# Altium PCB Audio_Meter_V4.5.PcbDoc (part 1 of 5)
Units mil, origin at the board's own origin, x right, y up, seen from the top; angles counter-clockwise.
Board outline 2756.14 x 2519.69 mil, 2 copper layers (Top Layer, Bottom Layer), stack 57.087 mil thick; 109 components, 62 nets, 315 pads, 566 vias.
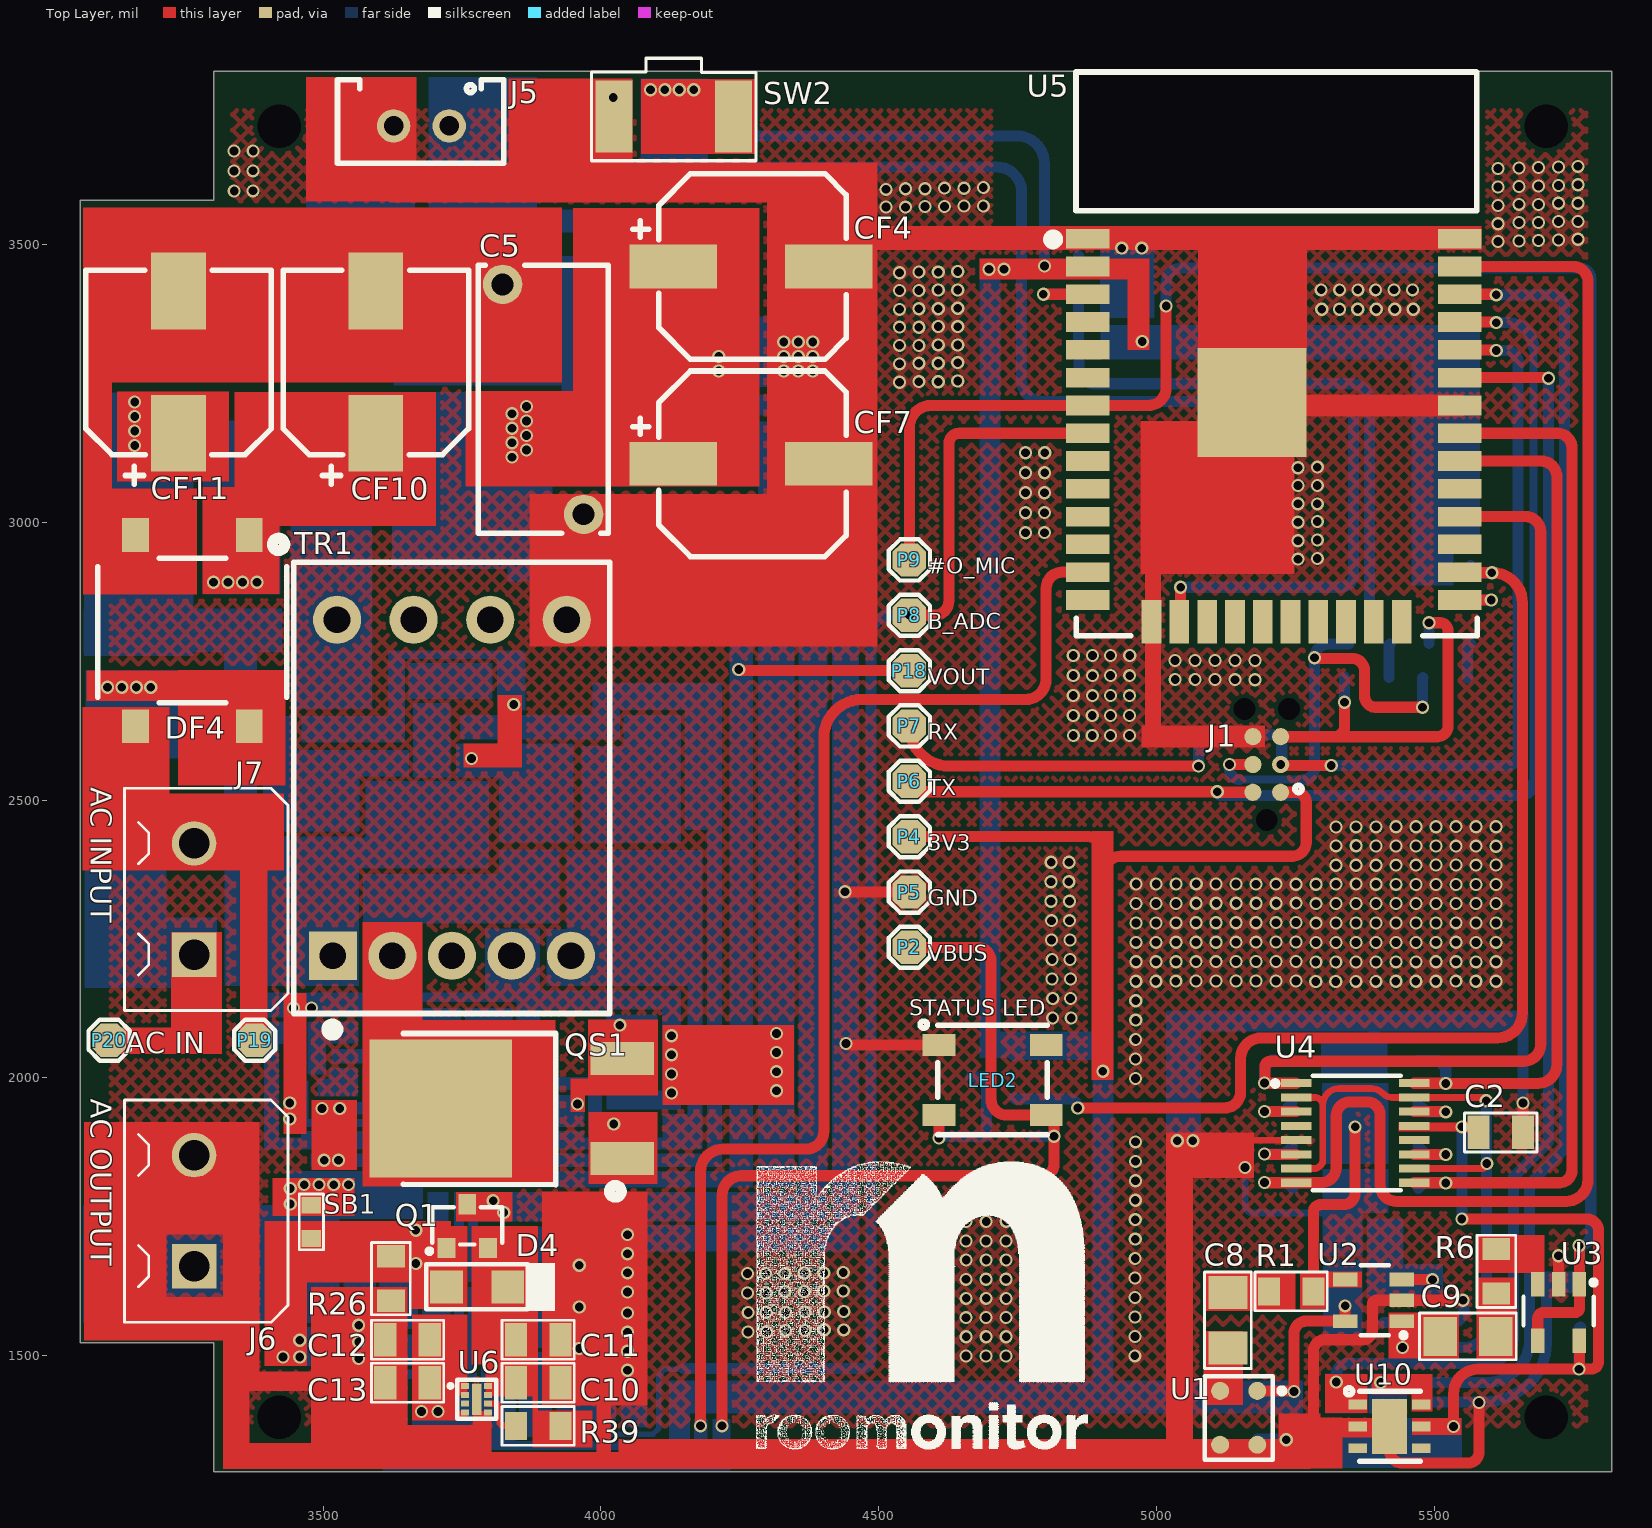
[diagram p0: Top Layer view]
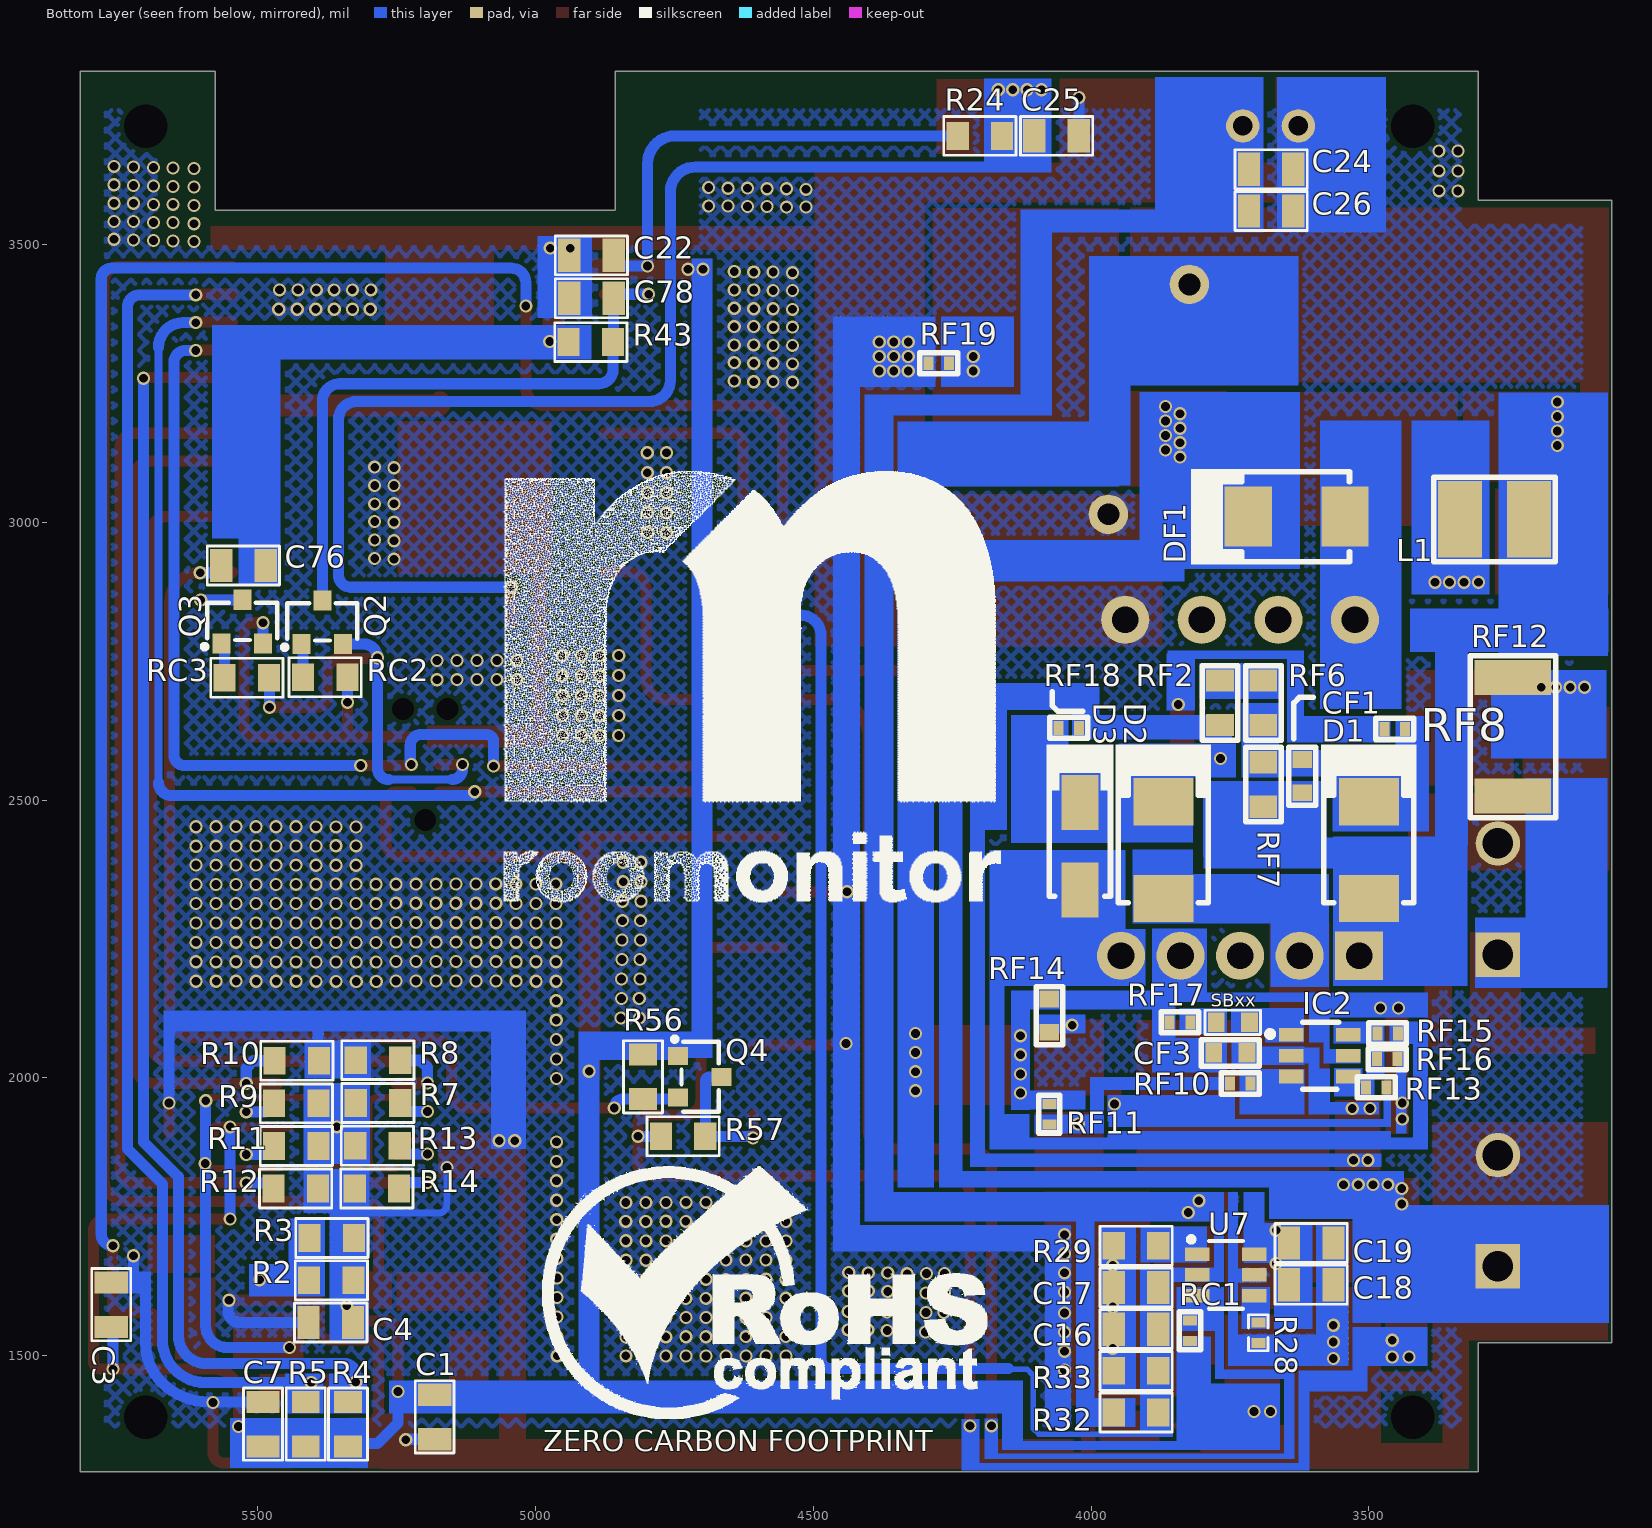
[diagram p1: Bottom Layer view, seen from below]
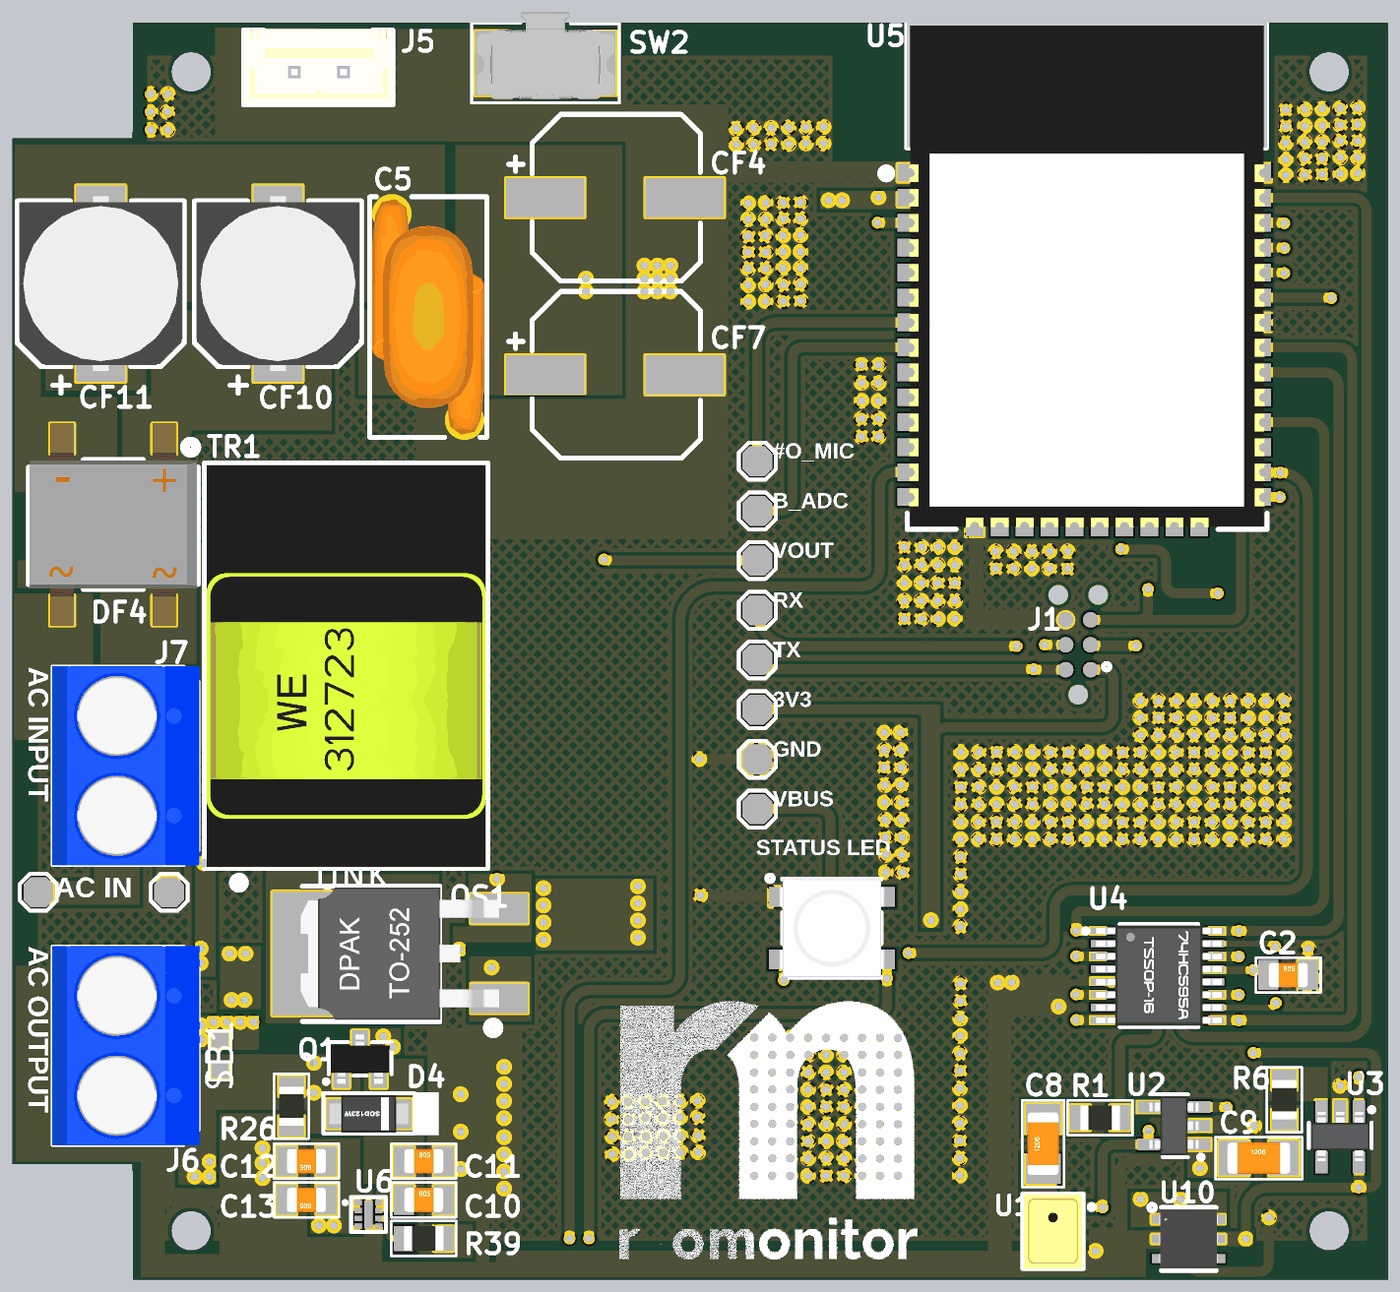
[diagram p3: 3D render of the assembled board from above, using the file's embedded part models]
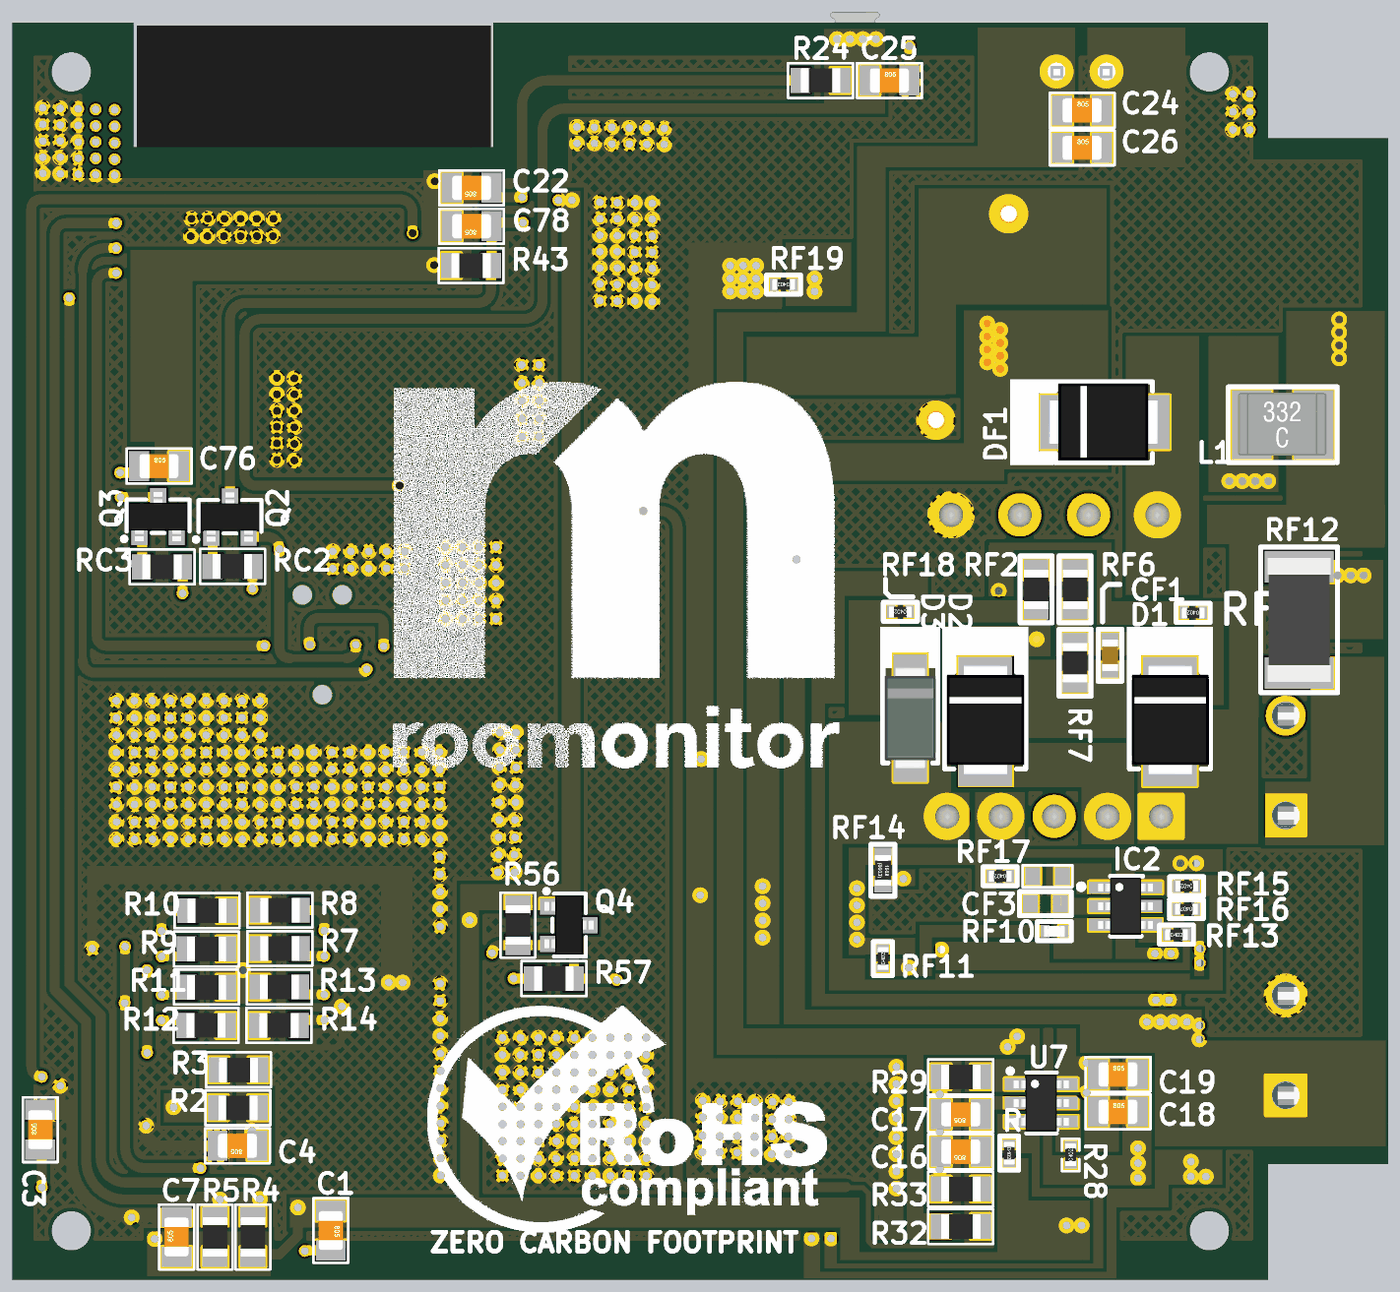
[diagram p4: 3D render of the assembled board from below, using the file's embedded part models]

## Layer stack, top to bottom
Top Solder: solder mask 2.7559, Solder Resist, Dk 3.5
Top Layer: signal copper 13.7795
Dielectric 1: dielectric 29.5276, FR-4, Dk 4.8
Bottom Layer: signal copper 13.7795
Bottom Solder: solder mask 3.1496, Solder Resist, Dk 3.5

## Board outline
3062.84,1523.28 3062.84,3579.03 3303,3579.03 3303,3811 4856,3811 4856,3561 5576,3561 5576,3811 5818.98,3811 5818.98,1291.32 3303,1291.31 3303,1523.28

## Design rules (kind name [scope] priority, off if disabled: settings)
Clearance [All] p1: gap=7 ignorepadtopadclearanceinfootprint=FALSE except(3: Arc-SMDPad Track-SMDPad SMDPad-SMDPad)
ComponentClearance [All] p1: gap=0 collisioncheckmode=3 verticalgap=0 showdistances=FALSE
MinimumSolderMaskSliver [All] p1: minsoldermaskwidth=0
PolygonConnect [All] p1: connectstyle=Direct reliefconductorwidth=10 reliefentries=4 polygonreliefangle="90 Angle" airgapwidth=10
RoutingVias [All] p1: holewidth=15.75 width=23.62 viastyle="Through Hole" minholewidth=15.75 minwidth=23.62 maxholewidth=28 maxwidth=50
SilkToSilkClearance [All] p1: silktosilkclearance=0
SilkToSolderMaskClearance [IsPad] p1: minsilkscreentomaskgap=0 clearancetoexposedcopper=TRUE
SolderMaskExpansion [All] p1: expansion=4
Width [All] p1: maxlimit=40 minlimit=10 preferedwidth=12
26 further rules are at their usual default settings.

## Classes and differential pairs
component class U_Supply_Section: TR1
component class U_Sensor_Section: C7 R4 R5 U10
component class U_Power_Section: C10 C11 C12 C13 D4 LED2 Q1 R26 R39 U6
component class U_Controller_Section: C22 C25 C76 C78 Q2 Q3 Q4 R24 R43 R56 R57 RC2 RC3 SW2 U5
component class U_Connector_Section: C24 C26 J1 J5 J6 J7 P2 P4 P5 P6 P7 P18 P19 P20 SB1
component class "U_Battery Charging_Section": C16 C17 C18 C19 P8 R28 R29 R32 R33 RC1 U7
component class U_Audio_Section: C1 C2 C3 C4 C8 C9 P9 R1 R2 R3 R6 R7 R8 R9 R10 R11 R12 R13 R14 U1 U2 U3 U4

## Components (designator, comment, footprint, x,y, rotation, side; value= is the part's Value field where it differs from the comment)
C1 "0.1uF" Cap0805 5181,1390 r270 bottom
C2 "0.1uF" Cap0805 5619,1902 r0 top
C3 "0.1uF" Cap0805 5763,1592 r90 bottom
C4 "0.1uF" Cap0805 5368,1560 r0 bottom
C5 "1000pF" RAD-0.4 3896,3221 r90 top
C7 "0.1uF" Cap0805 5490,1377 r90 bottom
C8 "1206YC105K4T2A" Cap1206 5128,1564 r90 top
C9 "1206YC105K4T2A" Cap1206 5560,1535 r0 top
C10 "0.1uF" Cap0805 3887,1451.5 r0 top
C11 "1uF" Cap0805 3887,1529 r0 top
C12 "0.1uF" Cap0805 3652,1529 r180 top
C13 "1uF" Cap0805 3652,1451.5 r180 top
C16 "1uF" Cap0805 3919,1548 r0 bottom
C17 "0.1uF" Cap0805 3919,1623 r0 bottom
C18 "1uF" Cap0805 3604,1628 r180 bottom
C19 "0.1uF" Cap0805 3604,1703 r180 bottom
C22 "0.1uF" Cap0805 4899,3480 r0 bottom
C24 "0.1uF" Cap0805 3676,3635 r180 bottom
C25 "0.1uF" Cap0805 4062,3695 r180 bottom
C26 "4.7UF" Cap0805 3676,3560 r180 bottom
C76 "0.1uF" Cap0805 5525,2922 r180 bottom
C78 "1uF" Cap0805 4899,3403 r0 bottom
CF1 "1nF" Cap0603 3620,2543 r270 bottom
CF3 "0.33uF" Cap0603 3749.5,2045 r180 bottom
CF4 "560uF" EEE-TC1A561UV 4270,3460 r0 top
CF7 "560uF" EEE-TC1A561UV 4270,3105 r0 top
CF10 "4.7uF" ULR2G4R7MNL1GS 3595,3287.95 r90 top
CF11 "4.7uF" ULR2G4R7MNL1GS 3240,3287.95 r90 top
D1 "SMBJP6KE82A-TP" SMB 3500,2410 r90 bottom
D2 "MURS160-13" SMB 3870,2410 r90 bottom
D3 "RS1B-13-F" SMA 4020,2417 r90 bottom
D4 "PMEG3010ER,115" PMEG3010ER,115 3722,1624 r0 top
DF1 "B340LB-13-F" SMB 3630,3010 r0 bottom
DF4 "DF04S-T" DF04S-T 3265,2805 r0 top
IC2 "UCC28700DBVR" SOT-23-6 3588.82,2040 r180 bottom
J1 "TC2030-IDC" TC2030-IDC 5198,2564 r90 top
J5 "B2B-EH-A(LF)(SN)" B2B-EH-A(LF)(SN) 3677,3713 r180 top
J6 "Terminal Block 2POS" "Terminal Block 2P" 3268,1661 r90 top
J7 "Terminal Block 2POS" "Terminal Block 2P" 3268,2222 r90 top
L1 "470uH" 84474C 3275,3005 r180 bottom
LED2 "1655" 1655 4704.61,1996.01 r0 top locked
P2 "TEST POINT" "TEST POINT" 4555,2235 r0 top
P4 "TEST POINT" "TEST POINT" 4555,2434.14 r0 top
P5 "TEST POINT" "TEST POINT" 4555,2334.57 r0 top
P6 "TEST POINT" "TEST POINT" 4555,2533.71 r0 top
P7 "TEST POINT" "TEST POINT" 4555,2633.29 r0 top
P8 "TEST POINT" "TEST POINT" 4555,2832.43 r0 top
P9 "TEST POINT" "TEST POINT" 4555,2932 r0 top
P18 "TEST POINT" "TEST POINT" 4555,2732.86 r0 top
P19 "TEST POINT" "TEST POINT" 3377,2068 r0 top
P20 "TEST POINT" "TEST POINT" 3115,2068 r0 top
Q1 "DMP2045U-7" SOT-23 3759.4,1733.37 r0 top
Q2 "MMBT2222A-7-F" SOT-23 5383,2820 r180 bottom
Q3 "MMBT2222A-7-F" SOT-23 5527,2821 r180 bottom
Q4 "BSS138LT1G" SOT-23 4704,2002 r270 bottom
QS1 "STD2HNK60Z" STD2HNK60Z 3875,1945 r90 top
R1 "1K" RES0805 5242,1616 r0 top
R2 "10K" RES0805 5367,1636 r180 bottom
R3 "10K" RES0805 5366,1712 r180 bottom
R4 "10K" RES0805 5337,1377 r270 bottom
R5 "10K" RES0805 5413,1377 r270 bottom
R6 "1K" RES0805 5611,1652 r270 top
R7 "47K" RES0805 5283,1955 r0 bottom
R8 "10K" RES0805 5283,2032 r180 bottom
R9 "100K" RES0805 5430,1954.33 r180 bottom
R10 "10K" RES0805 5429,2031 r0 bottom
R11 "220K" RES0805 5430,1877.67 r180 bottom
R12 "10K" RES0805 5431,1801 r0 bottom
R13 "470K" RES0805 5284,1878 r0 bottom
R14 "10K" RES0805 5285,1801 r180 bottom
R24 "10K" RES0805 4200,3695 r0 bottom
R26 "100K" RES0805 3622,1639 r90 top
R28 "665R" Res0402 3699,1541.5 r90 bottom
R29 "10K" RES0805 3919,1698 r180 bottom
R32 "1M" RES0805 3919,1398 r0 bottom
R33 "1M" RES0805 3919,1473 r0 bottom
R39 "10K" RES0805 3887,1374 r0 top
R43 "10K" RES0805 4900,3324 r0 bottom
R56 "10K" RES0805 4806,2002 r270 bottom
R57 "10K" RES0805 4734,1895 r180 bottom
RC1 "10K" Res0402 3822,1545 r270 bottom
RC2 "10K" RES0805 5378,2721 r0 bottom
RC3 "10K" RES0805 5519,2720 r0 bottom
RF2 "5.11M" "RES 0805" 3768,2675 r90 bottom
RF6 "5.11M" "RES 0805" 3690,2675 r90 bottom
RF7 "5.11M" "RES 0805" 3690,2528 r270 bottom
RF8 "487R" Res0402 3453.5,2628 r0 bottom
RF10 "10R" Res0402 3731.5,1990 r180 bottom
RF11 "10K" Res0402 4075,1935 r90 bottom
RF12 "10R" "RES 2512" 3241,2614 r270 bottom
RF13 "4.64K" Res0402 3487,1983 r180 bottom
RF14 "2.05R" Res0603 4075,2112 r270 bottom
RF15 "121K" Res0402 3466.5,2080 r0 bottom
RF16 "30.1K" Res0402 3467,2034 r0 bottom
RF17 "10K" Res0402 3840,2100 r0 bottom
RF18 "22.6R" Res0402 4040,2630 r0 bottom
RF19 "3.01K" Res0402 4274,3286 r0 bottom
SB1 "Solder Bridge" "Solder Bridge" 3479,1741 r90 top
SBxx "Solder Bridge" "Solder Bridge" 3745,2100 r0 bottom
SW2 "Switch" KSS221GLFS 4131,3730 r180 top
TR1 "750312723" 750312723 3731.83,2522.17 r90 top
U1 "SPU0410HR5H-PB" SPU0410HR5H-PB 5114.07,1437 r0 top locked
U2 "OPA344NA/250" SOT23-5 5390,1600 r180 top locked
U3 "OPA344NA/250" SOT23-5 5723,1578 r270 top locked
U4 "ADG712BRUZ-REEL" 16-TSSOP 5360,1901 r0 top locked
U5 "ESP32-WROOM-32 (16MB)" "ESP32-WROOM-32 (16MB)" 5210.35,3165.31 r0 top locked
U6 "NCP186AMX330TAG" NCP186AMX330TAG 3776.33,1421.87 r0 top
U7 "BQ21040DBVR" SOT-23-6 3757.82,1645.6 r180 bottom
U10 "SI7021-A20-GM1R" SI7021-A20-GM1R 5419.09,1373 r0 top locked

## Footprints (in the part's own frame and the unit in brackets; to place one, negate y for a bottom-side part, rotate by r counter-clockwise, add the part's x,y. Pads: shape width x height; smd on the part's side, far side on the other; paste and mask are expansions set on the pad)
16-TSSOP [mm]
  rect 1.4x0.37 smd: 1(-2.775,2.275) 2(-2.775,1.625) 3(-2.775,0.975) 4(-2.775,0.325) 5(-2.775,-0.325) 6(-2.775,-0.975) 7(-2.775,-1.625) 8(-2.775,-2.275) 9(2.625,-2.275) 10(2.625,-1.625) 11(2.625,-0.975) 12(2.625,-0.325) 13(2.625,0.325) 14(2.625,0.975) 15(2.625,1.625) 16(2.625,2.275)
  silkscreen extent -3.85,-2.62 2.01,2.62, body extent -3.2,-2.55 3.2,2.55, height 1.2
1655 [mm]
  rect 1.5x1 smd: 1(-2.45,1.6) 2(-2.45,-1.6) 3(2.45,-1.6) 4(2.45,1.6)
  silkscreen extent -3.31,-2.5 2.5,2.7, body extent -2.7,-2.5 2.7,2.5, height 1.58
84474C [mm]
  rect 2x3.5 smd: 1(-1.549,0) 2(1.6,0)
  silkscreen extent -2.74,-1.93 2.79,1.93, body extent -2.25,-1.57 2.25,1.63, height 2.61
750312723 [mm]
  rect 2.2x2.2 hole 1.22: 1(-7.675,5.44)
  round 2.2 hole 1.22: 2(-7.675,2.72) 3(-7.675,0) 4(-7.675,-2.72) 5(-7.675,-5.44) 6(7.675,-5.25) 7(7.675,-1.75) 8(7.675,1.75) 9(7.675,5.25)
  silkscreen extent -11.31,-7.21 10.31,7.22, body extent -10.24,-7.1 10.21,7.1, height 10.8
B2B-EH-A(LF)(SN) [mil]
  round 60 hole 35.43: 1(-50,0) 2(50,0)
  silkscreen extent -148,-83 151,67, body extent -148,-86 148,64, height 244
Cap0603 [mil]
  rect 30x35 smd: 1(30,0) 2(-30,0)
  silkscreen extent -52,-24 52,24, body extent -31,-16 32,16, height 34
Cap0805 [mil] "SMD 0805"
  rect 40x60 smd: 1(-40,0) 2(40,0)
  silkscreen extent -65,-35 65,35, body extent -39,-25 39,25, height 30
Cap1206 [mil] "SMD 1206"
  rect 60x70 smd: 1(-50,0) 2(50,0)
  silkscreen extent -87,-42 87,42, body extent -63,-31 63,32, height 39
DF04S-T [mm]
  rect 1.22x1.54 smd: 1(2.6,4.37) 2(2.6,-4.37) 3(-2.6,4.37) 4(-2.6,-4.37)
  silkscreen extent -4.32,-3.3 4.32,4.22, body extent -4.25,-5.15 4.26,5.15, height 3.55
EEE-TC1A561UV [mm]
  rect 4x2 smd: 1(-3.55,0) 2(3.55,0)
  silkscreen extent -5.41,-4.24 4.34,4.24, body extent -4.85,-4.15 4.85,4.15, height 10.5
"ESP32-WROOM-32 (16MB)" [mm]
  rect 2x0.9 smd: 1(-8.5,8.755) 2(-8.5,7.485) 3(-8.5,6.215) 4(-8.5,4.945) 5(-8.5,3.675) 6(-8.5,2.405) 7(-8.5,1.135) 8(-8.5,-0.135) 9(-8.5,-1.405) 10(-8.5,-2.675) 11(-8.5,-3.945) 12(-8.5,-5.215) 13(-8.5,-6.485) 14(-8.5,-7.755) 25(8.5,-7.755) 26(8.5,-6.485) 27(8.5,-5.215) 28(8.5,-3.945) 29(8.5,-2.675) 30(8.5,-1.405) 31(8.5,-0.135) 32(8.5,1.135) 33(8.5,2.405) 34(8.5,3.675) 35(8.5,4.945) 36(8.5,6.215) 37(8.5,7.485) 38(8.5,8.755)
  rect 0.9x2 smd: 15(-5.58,-8.755) 16(-4.31,-8.755) 17(-3.04,-8.755) 18(-1.77,-8.755) 19(-0.5,-8.755) 20(0.77,-8.755) 21(2.04,-8.755) 22(3.31,-8.755) 23(4.58,-8.755) 24(5.85,-8.755)
  rect 5x5 smd: 39(-0.991,1.27)
  silkscreen extent -10.28,-9.4 9.3,16.38, body extent -8.91,-9.3 9.16,16.24, height 3.01
KSS221GLFS [mil] "Tactile Switch SPST-NO Side Actuated Surface Mount, Right Angle"
  rect 66.93x130 smd: 1(-107.3,0) 2(107.3,0)
  silkscreen extent -148,-105 148,80, body extent -138,-101 138,72, height 65
NCP186AMX330TAG [mm]
  rect 0.37x0.28 smd: 1(-0.525,0.6) 2(-0.525,0.2) 3(-0.525,-0.2) 4(-0.525,-0.6) 5(0.525,-0.6) 6(0.525,-0.2) 7(0.525,0.2) 8(0.525,0.6)
  rect 0.44x1.44 smd: 9(0,0)
  silkscreen extent -1.27,-0.89 0.89,0.89
PMEG3010ER,115 [mm] "DIODE SCHOTTKY 30V 1A SOD123W"
  rect 1.5x1.5 smd: A(0,0) K(2.8,0)
  silkscreen extent -0.91,-1.09 4.95,1.09, body extent -0.6,-0.95 3.4,0.95, height 1.1
RAD-0.4 [mm] "Radial Cap, Thru-Hole; 2 Leads; 0.4 in Pin Spacing"
  round 1.8 hole 1: 1(-5.254,-1.852) 2(5.254,1.852)
  silkscreen extent -6.12,-2.97 6.12,2.97, body extent -6.02,-2.84 6.03,2.86, height 12.65
Res0402 [mil]
  rect 18x25 smd: 1(-18.5,0) 2(18.5,0)
  silkscreen extent -32,-18 32,18, body extent -23,-11 23,11, height 16
Res0603 [mil]
  rect 30x35 smd: 1(30,0) 2(-30,0)
  silkscreen extent -52,-24 52,24, body extent -31,-17 31,17, height 18
RES0805 [mil] "Resistor-SMD-0805"
  rect 40x50 smd: 1(-40,0) 2(40,0)
  silkscreen extent -65,-35 65,35, body extent -39,-25 39,24, height 24
"RES 0805" [mil] "SMD 0805"
  rect 40x50 smd: 1(-40,0) 2(40,0)
  silkscreen extent -67,-32 67,32, body extent -39,-25 39,24, height 24
"RES 2512" [mm] "RES SMD (2512)"
  rect 1.6x3.5 smd: 1(-2.7,0) 2(2.7,0)
  silkscreen extent -3.71,-1.96 3.71,1.96, body extent -3.15,-1.6 3.15,1.6, height 0.71
SI7021-A20-GM1R [mm]
  rect 0.85x0.45 smd: 1(-1.45,1) 2(-1.45,0) 3(-1.45,-1) 4(1.45,-1) 5(1.45,0) 6(1.45,1)
  rect 1.6x2.5 smd: 7(0,0)
  silkscreen extent -2.02,-1.6 1.4,1.76, body extent -1.5,-1.5 1.5,1.5, height 1.22
SMA [mm]
  rect 2.5x1.7 smd: 1(-2,0) 2(2,0)
  silkscreen extent -2.29,-1.52 4.65,1.52, body extent -2.6,-1.3 2.6,1.3, height 2.37
SMB [mil]
  rect 85x107.99 smd: 1(-87.01,0) 2(87.01,0)
  silkscreen extent -95,-86 190,86, body extent -107,-78 113,77, height 96
"Solder Bridge" [mil] "Solder Bridge ON"
  rect 30x35 smd: 1(-30,0) 2(30,0)
  silkscreen extent -50,-22 50,22
SOT23-5 [mm] "SOT23-5 Package"
  rect 1.12x0.62 smd: 1(-1.3,0.95) 2(-1.3,0) 3(-1.3,-0.95) 4(1.3,-0.95) 5(1.3,0.95)
  silkscreen extent -1.48,-1.6 0.58,1.71, body extent -1.25,-1.5 1.25,1.5, height 1.09
SOT-23 [mm]
  rect 0.82x0.92 smd: 1(-0.95,-1) 2(0.95,-1) 3(0,1)
  silkscreen extent -1.82,-1.23 1.6,0.86, body extent -1.5,-1.25 1.5,1.25, height 1.1
SOT-23-6 [mm] "IC BAT CHG LI-ION 1 CELL SOT23-6"
  rect 1.12x0.62 smd: 1(-1.3,0.95) 2(-1.3,0) 3(-1.3,-0.95) 4(1.3,-0.95) 5(1.3,0) 6(1.3,0.95)
  silkscreen extent -2.4,-1.52 0.86,1.52, body extent -1.4,-1.45 1.4,1.45, height 1.44
SPU0410HR5H-PB [mm]
  round 0.82 smd: 1(1.7,0) 2(1.7,-2.46) 3(0,-2.46) 4(0,0)
  silkscreen extent -0.71,-3.15 2.95,0.67, body extent -0.62,-3.11 2.33,0.65, height 1.03
STD2HNK60Z [mm]
  rect 1.5x2.9 smd: 1(-2.286,-4.15) 3(2.286,-4.15)
  rect 6.3x6.5 smd: 2(0,4.15)
  silkscreen extent -4.05,-4.11 3.43,5.87, body extent -3.37,-4.14 3.37,5.96, height 2.37
TC2030-IDC [mil] "CABLE ADAPTER 6 POS"
  round 30.98 smd: 1(-50,-25) 1(-50,-25) 2(-50,25) 3(0,-25) 4(0,25) 5(50,-25) 6(50,25)
  round 0 hole 39.02: MP5(-100,0) MP6(100,-40) MP7(100,40)
  silkscreen extent -50,-63 -38,-51
"Terminal Block 2P" [mil] "TERMINAL BLOCK 2POS 5.08MM SIDE"
  rect 80x80 hole 55: 1(0,0)
  round 80 hole 55: 2(200,0)
  silkscreen extent -101,-169 299,125, body extent -101,-170 299,125, height 394
"TEST POINT" [mil]
  oct 60x60 smd: 1(0,0)
  silkscreen extent -37,-37 37,37
ULR2G4R7MNL1GS [mm]
  rect 3.5x2.5 smd: 1(-3.25,0) 2(3.25,0)
  silkscreen extent -5.59,-4.24 4.2,4.24, body extent -4.44,-4.15 4.45,4.15, height 10.06

## Part data
C1 C2 C3 C4 C7 C10 C12 C17 C19 C22 C24 C25 C76: library part CL21F104ZBCNNNC, "CAP CER 0.1UF 50V Y5V 0805", Capacitance=100nF, Case/Package=0805, Case Code (Metric)=2012, Dielectric=Y5V, MANUFACTURER=Samsung, Max Operating Temperature=85°C, Min Operating Temperature=-30°C, Package Quantity=1, Supplier Part Number 1=1276-1007-6-ND, Tolerance=80%, Voltage Rating=50V, Case Code (Imperial)=0805, ComponentLink1Description=https://media.digikey.com/pdf/Data%20Sheets/Samsung%20PDFs/CL_Series_MLCC_ds.pdf?src-supplier=Digi-Key, ComponentLink1URL=https://media.digikey.com/pdf/Data%20Sheets/Samsung%20PDFs/CL_Series_MLCC_ds.pdf?src-supplier=Digi-Key, Depth=1.25mm, Height=0.85mm, Length=2mm, Manufacturer Part Number=CL21F104ZBCNNNC, Material=Ceramic, Mount="Surface Mount", Packaging="Tape and Reel", Pricing 1="1=0.1, 10=0.044, 100=0.0195, 500=0.0139, 1000=0.01092 (USD)", Radiation Hardening=No, Stock 1=4901061, Supplier 1=Digi-Key, Thickness=0.037inch, Width=0.049inch
C5: library part 440LD10-R, "CAP CER 1000PF 760VAC Y5U RADIAL", Capacitance=1nF, Case/Package=Radial, Dielectric=Y5U, MANUFACTURER=Vishay, Max Operating Temperature=125°C, Min Operating Temperature=-30°C, Package Quantity=250, Resistor Type=Ceramic, Supplier Part Number 1=70079820, Tolerance=20%, Voltage=760V, Voltage Rating=300V, Voltage Rating (AC)=500V, Voltage Rating (DC)=400V, Category="Ceramic Capacitors", ComponentLink1Description=https://datasheet.ciiva.com/5383/440l-239711-5383856.pdf?src-supplier=Mouser, ComponentLink1URL=https://datasheet.ciiva.com/5383/440l-239711-5383856.pdf?src-supplier=Mouser, ComponentLink2Description=https://datasheet.ciiva.com/15164/getdatasheetpartid-107669-15164784.pdf?src-supplier=Verical, ComponentLink2URL=https://datasheet.ciiva.com/15164/getdatasheetpartid-107669-15164784.pdf?src-supplier=Verical, ComponentLink3Description=https://datasheet.ciiva.com/197/440lseries-197823.pdf?src-supplier=Digi-Key, ComponentLink3URL=https://datasheet.ciiva.com/197/440lseries-197823.pdf?src-supplier=Digi-Key, ComponentLink4Description=https://datasheet.ciiva.com/8031/1838975-8031887.pdf?src-supplier=Element14, ComponentLink4URL=https://datasheet.ciiva.com/8031/1838975-8031887.pdf?src-supplier=Element14, Depth=5.6mm, Diameter=9.3mm, Dissipation Factor=2%, Height=5.7mm, Height - Seated (Max)=0.492inch, Lead Diameter=0.81mm, Lead Free="Lead Free", Lead Length=28.8mm, Lead Pitch=9.5mm, Lead/Base Style=Straight, Length=2inch, Manufacturer Part Number=440LD10-R, Mount="Through Hole,PCB", Packaging=Bulk, Pricing 1="1=0.59200, 25=0.46900, 100=0.45900, 250=0.43900, 500=0.40800, 1000=0.38800, 2500=0.37700 (USD)", Radiation Hardening=No, REACH SVHC=Unknown, RoHS=Yes, Stock 1=1070, Supplier 1="Allied Electronics", Termination=Radial, Weight=0.01lb, Width=0.25inch
C8 C9: "CAP CER 1UF 16V X7R 1206", Capacitance=1uF, Case/Package=1206, Case Code (Metric)=3216, Dielectric=X7R, MANUFACTURER="Kyocera AVX", Max Operating Temperature=125°C, Min Operating Temperature=-55°C, Package Quantity=2000, Ratings=AEC-Q200, Supplier Part Number 1=478-10899-1-ND, Tolerance=10%, Voltage Rating=16V, Case Code (Imperial)=1206, ComponentLink1Description=http://www.mouser.com/ds/2/40/AutoMLCC-777028.pdf?src-supplier=Mouser, ComponentLink1URL=http://www.mouser.com/ds/2/40/AutoMLCC-777028.pdf?src-supplier=Mouser, ComponentLink2Description=http://www.avxcorp.com/docs/Catalogs/cauto.pdf?src-supplier=Avnet, ComponentLink2URL=http://www.avxcorp.com/docs/Catalogs/cauto.pdf?src-supplier=Avnet, ComponentLink3Description=http://www.avx.com/docs/Catalogs/cauto.pdf?src-supplier=Future+Electronics, ComponentLink3URL=http://www.avx.com/docs/Catalogs/cauto.pdf?src-supplier=Future+Electronics, ComponentLink4Description=http://www.avx.com/docs/Catalogs/cx7r.pdf?src-supplier=Digi-Key, ComponentLink4URL=http://www.avx.com/docs/Catalogs/cx7r.pdf?src-supplier=Digi-Key, Depth=1.6mm, Lead Free="Lead Free", Length=3.2mm, Manufacturer Part Number=1206YC105K4T2A, Mount="Surface Mount", Packaging="Tape and Reel", Pricing 1="1=0.41, 10=0.285, 100=0.1708, 500=0.12808, 1000=0.10816 (USD)", Radiation Hardening=No, Stock 1=1895, Supplier 1=Digi-Key, Termination=SMD/SMT, Thickness=0.037inch, Voltage Rating (DC)=16V, Width=1.6mm
C11 C13 C16 C18 C78: library part CL21B105KOFNNNG, "CAP CER 1UF 16V X7R 0805", Case/Package=0805, Case Code (Metric)=2012, Dielectric=X7R, MANUFACTURER=Samsung, Max Operating Temperature=125°C, Min Operating Temperature=-55°C, Package Quantity=3000, Supplier Part Number 1=1276-6471-6-ND, Tolerance=10%, Voltage=16V, Capacitance=1uF, Case Code (Imperial)=0805, ComponentLink1Description=http://www.samsungsem.com/global/support/library/product-catalog/__icsFiles/afieldfile/2014/11/13/MLCC.pdf?src-supplier=Digi-Key, ComponentLink1URL=http://www.samsungsem.com/global/support/library/product-catalog/__icsFiles/afieldfile/2014/11/13/MLCC.pdf?src-supplier=Digi-Key, ComponentLink2Description=http://www1.futureelectronics.com/doc/SAMSUNG%20PASSIVE/CL05B104KQ5NNNC.pdf?src-supplier=Future+Electronics, ComponentLink2URL=http://www1.futureelectronics.com/doc/SAMSUNG%20PASSIVE/CL05B104KQ5NNNC.pdf?src-supplier=Future+Electronics, ComponentLink3Description=https://www.distrelec.biz/Web/Downloads/_e/ng/MLCC_CatalogDownload2013_ENG.pdf?mime=application%2Fpdf&src-supplier=Distrelec, ComponentLink3URL=https://www.distrelec.biz/Web/Downloads/_e/ng/MLCC_CatalogDownload2013_ENG.pdf?mime=application%2Fpdf&src-supplier=Distrelec, ComponentLink4Description=https://produktinfo.conrad.com/datenblaetter/450000-474999/455935-da-01-en-VS_KONDENSATOR_0805.pdf?src-supplier=Conrad, ComponentLink4URL=https://produktinfo.conrad.com/datenblaetter/450000-474999/455935-da-01-en-VS_KONDENSATOR_0805.pdf?src-supplier=Conrad, Depth=1.25mm, Height=1.25mm, Lead Free="Lead Free", Length=2mm, Manufacturer Part Number=CL21B105KOFNNNG, Material=Ceramic, Mount="Surface Mount", Packaging="Tape and Reel", Pricing 1="1=0.1, 10=0.047, 100=0.0211, 500=0.01508, 1000=0.01185 (USD)", Stock 1=507348, Supplier 1=Digi-Key, Thickness=0.053inch, Voltage Rating=16V, Width=0.049inch
C26: library part C0805C475K4PACTU, "CAP CER 4.7UF 16V 10% X5R 0805", Capacitance=4.7uF, Case/Package=0805, Dielectric=X5R, Dielectric Material=Ceramic, MANUFACTURER=KEMET, Max Operating Temperature=85°C, Min Operating Temperature=-55°C, Supplier Part Number 1=36X2756, Tolerance=10%, Voltage=16V, ComponentLink1Description=http://www.samsungsem.com/global/support/library/product-catalog/__icsFiles/afieldfile/2014/11/13/MLCC.pdf?src-supplier=Digi-Key, ComponentLink1URL=http://www.samsungsem.com/global/support/library/product-catalog/__icsFiles/afieldfile/2014/11/13/MLCC.pdf?src-supplier=Digi-Key, ComponentLink2Description=http://www1.futureelectronics.com/doc/SAMSUNG%20PASSIVE/CL05B104KQ5NNNC.pdf?src-supplier=Future+Electronics, ComponentLink2URL=http://www1.futureelectronics.com/doc/SAMSUNG%20PASSIVE/CL05B104KQ5NNNC.pdf?src-supplier=Future+Electronics, ComponentLink3Description=https://www.distrelec.biz/Web/Downloads/_e/ng/MLCC_CatalogDownload2013_ENG.pdf?mime=application%2Fpdf&src-supplier=Distrelec, ComponentLink3URL=https://www.distrelec.biz/Web/Downloads/_e/ng/MLCC_CatalogDownload2013_ENG.pdf?mime=application%2Fpdf&src-supplier=Distrelec, ComponentLink4Description=https://produktinfo.conrad.com/datenblaetter/450000-474999/455935-da-01-en-VS_KONDENSATOR_0805.pdf?src-supplier=Conrad, ComponentLink4URL=https://produktinfo.conrad.com/datenblaetter/450000-474999/455935-da-01-en-VS_KONDENSATOR_0805.pdf?src-supplier=Conrad, ComponentLink5Description=http://capacitoredge.kemet.com/capedge2/DataSheet?pn=C0805C475K4PAC7800&src-supplier=Avnet+Europe, ComponentLink5URL=http://capacitoredge.kemet.com/capedge2/DataSheet?pn=C0805C475K4PAC7800&src-supplier=Avnet+Europe, ComponentLink6Description=https://www.verical.com/server-webapp/html/getDatasheet?partID=319476&src-supplier=Verical, ComponentLink6URL=https://www.verical.com/server-webapp/html/getDatasheet?partID=319476&src-supplier=Verical, Depth=1.25mm, Height=1.25mm, Lead Free="Lead Free", Length=2mm, Manufacturer Part Number=C0805C475K4PACTU, Mount="Surface Mount", Packaging="Tape and Reel", Pricing 1="1=0.142, 2500=0.14, 5000=0.139, 10000=0.137 (USD)", Radiation Hardening=No, Stock 1=22500, Supplier 1=Newark, Termination=SMD/SMT, Voltage Rating (DC)=16V
CF1: library part 0603B102K201CT, "CAP CER 1000PF 200V X7R 0603", Case/Package=0603, Case Code (Metric)=1608, Dielectric=X7R, MANUFACTURER="Walsin Technologies", Max Operating Temperature=125°C, Min Operating Temperature=-55°C, Supplier Part Number 1=1292-1379-1-ND, Tolerance=10%, Voltage Rating=200V, Capacitance=1nF, Case Code (Imperial)=0603, Category="Ceramic Capacitors", ComponentLink1Description=http://www.farnell.com/datasheets/1958513.pdf?src-supplier=Farnell, ComponentLink1URL=http://www.farnell.com/datasheets/1958513.pdf?src-supplier=Farnell, ComponentLink2Description=http://www.farnell.com/datasheets/1958513.pdf?src-supplier=Element14, ComponentLink2URL=http://www.farnell.com/datasheets/1958513.pdf?src-supplier=Element14, ComponentLink3Description=http://www.passivecomponent.com/wp-content/uploads/2018/10/MLCC.pdf?src-supplier=Digi-Key, ComponentLink3URL=http://www.passivecomponent.com/wp-content/uploads/2018/10/MLCC.pdf?src-supplier=Digi-Key, Manufacturer Part Number=0603B102K201CT, Packaging="Cut Tape", Pricing 1="1=0.10000, 10=0.06800, 50=0.03740, 100=0.03050, 500=0.02180, 1000=0.01712 (USD)", REACH SVHC=Unknown, RoHS=No, Stock 1=60399, Supplier 1=Digi-Key, Voltage Rating (DC)=200V
CF3: library part CGA3E3X7R1H334M080AB, "CAP CER 0.33UF 50V X7R 0603", Capacitance=330nF, Case/Package=0603, Case Code (Metric)=1608, Dielectric=X7R, MANUFACTURER=TDK, Max Operating Temperature=125°C, Min Operating Temperature=-55°C, Package Quantity=4000, Ratings=AEC-Q200, Supplier Part Number 1=445-181020-1-ND, Tolerance=20%, Voltage Rating=50V, Case Code (Imperial)=0603, Category="Ceramic Capacitors", ComponentLink1Description=http://www.mouser.com/ds/2/400/lcc_automotive_general_en-843974.pdf?src-supplier=Mouser, ComponentLink1URL=http://www.mouser.com/ds/2/400/lcc_automotive_general_en-843974.pdf?src-supplier=Mouser, ComponentLink2Description=http://product.tdk.com/capacitor/mlcc/class/print_detail_pdf.php?lang=en&part_no=CGA3E3X7R1H334M080AB&src-supplier=Avnet, ComponentLink2URL=http://product.tdk.com/capacitor/mlcc/class/print_detail_pdf.php?lang=en&part_no=CGA3E3X7R1H334M080AB&src-supplier=Avnet, ComponentLink3Description=https://product.tdk.com/info/en/catalog/datasheets/mlcc_automotive_general_en.pdf?src-supplier=Digi-Key, ComponentLink3URL=https://product.tdk.com/info/en/catalog/datasheets/mlcc_automotive_general_en.pdf?src-supplier=Digi-Key, Height=0.8mm, Length=0.063inch, Manufacturer Part Number=CGA3E3X7R1H334M080AB, Mount="Surface Mount", Packaging="Tape and Reel", Pricing 1="1=0.26000, 10=0.17600, 50=0.11760, 100=0.10000, 500=0.07056, 1000=0.06174 (USD)", RoHS=Yes, Stock 1=4397, Supplier 1=Digi-Key, Termination=SMD/SMT, Thickness=0.035inch, Voltage Rating (DC)=50V, Weight=7.1E-05oz, Width=0.031inch
CF4 CF7: library part EEE-TC1A561UV, "CAP ALUM 560UF 20% 10V SMD", MANUFACTURER=Panasonic, Supplier Part Number 1=P124843CT-ND, ComponentLink1Description=http://datasheet.octopart.com/EEE-TC1A561UV-Panasonic-datasheet-136612400.pdf?src-supplier=Electro+Sonic, ComponentLink1URL=http://datasheet.octopart.com/EEE-TC1A561UV-Panasonic-datasheet-136612400.pdf?src-supplier=Electro+Sonic, Manufacturer Part Number=EEE-TC1A561UV, Pricing 1="1=1.23000, 10=0.96800, 50=0.83860, 100=0.72560 (USD)", Stock 1=500, Supplier 1=Digi-Key
CF10 CF11: library part ULR2G4R7MNL1GS, "CAP ALUM 4.7UF 20% 400V SMD", Case/Package=SMD/SMT, Leakage Current=100uA, MANUFACTURER=Nichicon, Max Operating Temperature=105°C, Min Operating Temperature=-40°C, Package Quantity=500, Ripple Current=35mA, Supplier Part Number 1=493-6709-1-ND, Tolerance=20%, Voltage=400V, Capacitance=4.7uF, Category="Aluminum Electrolytic Capacitors", ComponentLink1Description=https://datasheet.ciiva.com/6317/e-lr-6317191.pdf?src-supplier=Digi-Key, ComponentLink1URL=https://datasheet.ciiva.com/6317/e-lr-6317191.pdf?src-supplier=Digi-Key, ComponentLink2Description=https://datasheet.ciiva.com/6317/e-lr-6317193.pdf?src-supplier=Digi-Key, ComponentLink2URL=https://datasheet.ciiva.com/6317/e-lr-6317193.pdf?src-supplier=Digi-Key, Diameter=10mm, Dissipation Factor=0.25%, Height=10mm, Height - Seated (Max)=0.433inch, Lead Free="Lead Free", Lead Pitch=4.5mm, Length=10mm, Life (Hours)=3000Hour, Manufacturer Part Number=ULR2G4R7MNL1GS, Mount="Surface Mount", Packaging="Tape and Reel", Pricing 1="1=0.77000, 10=0.56900, 50=0.45540, 100=0.39030 (USD)", RoHS=Yes, Stock 1=108237, Supplier 1=Digi-Key, Termination=SMD/SMT, Voltage Rating=400V, Voltage Rating (DC)=400V
D1: "TVS DIODE 70.1V 113V DO214AA", Breakdown Voltage=86.1V, Clamping Voltage=113V, MANUFACTURER=MCC, Max Operating Temperature=175°C, Max Surge Current=5.4A, Min Breakdown Voltage=77.9V, Min Operating Temperature=-55°C, Package Quantity=1, Peak Pulse Power=600W, Power Line Protection=No, Resistor Type=Zener, Reverse Standoff Voltage=70.1V, Supplier Part Number 1=SMBJP6KE82A-TPMSCT-ND, Category="TVS Diodes", ComponentLink1Description=https://datasheet.ciiva.com/334/smbjp6ke6-8ca-smbjp6ke550cado-214aa-334273.pdf?src-supplier=Digi-Key, ComponentLink1URL=https://datasheet.ciiva.com/334/smbjp6ke6-8ca-smbjp6ke550cado-214aa-334273.pdf?src-supplier=Digi-Key, ComponentLink2Description=https://datasheet.ciiva.com/334/smbjp6ke6-8ca-smbjp6ke550cado-214aa-334274.pdf?src-supplier=Digi-Key, ComponentLink2URL=https://datasheet.ciiva.com/334/smbjp6ke6-8ca-smbjp6ke550cado-214aa-334274.pdf?src-supplier=Digi-Key, ComponentLink3Description=https://datasheet.ciiva.com/334/smbjp6ke6-8ca-smbjp6ke550cado-214aa-334275.pdf?src-supplier=Digi-Key, ComponentLink3URL=https://datasheet.ciiva.com/334/smbjp6ke6-8ca-smbjp6ke550cado-214aa-334275.pdf?src-supplier=Digi-Key, Manufacturer Part Number=SMBJP6KE82A-TP, Mount="Surface Mount", Number of Channels=1, Number of Pins=2, Number of Unidirectional Channels=1, Packaging="Tape and Reel", Peak Pulse Current=5.4A, Polarity=Unidirectional, Pricing 1="1=0.38000, 10=0.28000, 100=0.19500, 500=0.12350, 1000=0.10075 (USD)", RoHS=Yes, Stock 1=960, Supplier 1=Digi-Key, Termination=SMD/SMT
D2: "DIODE GEN PURP 600V 1A SMB", Average Rectified Current=1A, Capacitance=45pF, Case/Package=SMB, Forward Voltage=1.25V, MANUFACTURER=Diodes, Manufacturer Part Number=MURS160-13-F, Max Forward Surge Current (Ifsm)=35A, Max Operating Temperature=150°C, Max Repetitive Reverse Voltage (Vrrm)=600V, Max Reverse Current=5uA, Min Operating Temperature=-55°C, Natural Thermal Resistance=15°C/W, Package Quantity=3000, Supplier Part Number 1=MURS160-FDICT-ND, Category="Rectifier Diodes", ComponentLink1Description=https://datasheet.ciiva.com/913/ds30130-913616.pdf?src-supplier=Avnet, ComponentLink1URL=https://datasheet.ciiva.com/913/ds30130-913616.pdf?src-supplier=Avnet, ComponentLink2Description=https://datasheet.ciiva.com/16200/ds30130-16200054.pdf?src-supplier=Future+Electronics, ComponentLink2URL=https://datasheet.ciiva.com/16200/ds30130-16200054.pdf?src-supplier=Future+Electronics, ComponentLink3Description=https://datasheet.ciiva.com/7964/ds30130-7964281.pdf?src-supplier=Element14, ComponentLink3URL=https://datasheet.ciiva.com/7964/ds30130-7964281.pdf?src-supplier=Element14, ComponentLink4Description=https://datasheet.ciiva.com/913/ds30130-913595.pdf?src-supplier=Digi-Key, ComponentLink4URL=https://datasheet.ciiva.com/913/ds30130-913595.pdf?src-supplier=Digi-Key, ComponentLink5Description=https://datasheet.ciiva.com/913/ds30130-913596.pdf?src-supplier=Digi-Key, ComponentLink5URL=https://datasheet.ciiva.com/913/ds30130-913596.pdf?src-supplier=Digi-Key, ComponentLink6Description=https://datasheet.ciiva.com/25947/ds30130-25947388.pdf?src-supplier=Avnet+Europe, ComponentLink6URL=https://datasheet.ciiva.com/25947/ds30130-25947388.pdf?src-supplier=Avnet+Europe, ComponentLink7Description=https://datasheet.ciiva.com/913/ds30130-913597.pdf?src-supplier=Digi-Key, ComponentLink7URL=https://datasheet.ciiva.com/913/ds30130-913597.pdf?src-supplier=Digi-Key, ComponentLink8Description=https://datasheet.ciiva.com/8303/ds30130-8303182.pdf?src-supplier=Avnet, ComponentLink8URL=https://datasheet.ciiva.com/8303/ds30130-8303182.pdf?src-supplier=Avnet, Contact Plating=Tin,Matte, Current=1A, Current Rating=1A, Element Configuration=Single, Forward Current=1A, Height=2.42mm, Lead Free="Lead Free", Length=4.57mm, Max Reverse Voltage (DC)=600V, Max Surge Current=35A, Mount="Surface Mount", Number of Pins=2, Output Current=1A, Packaging="Tape and Reel", Peak Non-Repetitive Surge Current=35A, Polarity=Standard, Pricing 1="1=0.38000, 10=0.28200, 100=0.19700, 500=0.12474, 1000=0.10176 (USD)", Radiation Hardening=No, REACH SVHC="No SVHC", Recovery Time=50ns, Reverse Recovery Time=50ns, Reverse Voltage (DC)=600V, RoHS=Yes, Stock 1=63486, Supplier 1=Digi-Key, Voltage=600V, Voltage Rating (DC)=600V, Weight=0.00328oz, Width=3.94mm
D3: "Diode Switching 100V 1A 2Pin SMA", Average Rectified Current=1A, Capacitance=15pF, Case/Package=SMA, Forward Voltage=1.3V, MANUFACTURER=Diodes, Max Operating Temperature=150°C, Max Repetitive Reverse Voltage (Vrrm)=100V, Max Reverse Current=5uA, Max Surge Current=30A, Min Operating Temperature=-65°C, Package Quantity=5000, Supplier Part Number 1=RS1B-FDICT-ND, Category="Rectifier Diodes", ComponentLink1Description=https://datasheet.ciiva.com/34302/1541360-34302413.pdf?src-supplier=Jameco, ComponentLink1URL=https://datasheet.ciiva.com/34302/1541360-34302413.pdf?src-supplier=Jameco, ComponentLink2Description=https://datasheet.ciiva.com/15144/getdatasheetpartid-71158-15144443.pdf?src-supplier=Verical, ComponentLink2URL=https://datasheet.ciiva.com/15144/getdatasheetpartid-71158-15144443.pdf?src-supplier=Verical, Current Rating=1A, Element Configuration=Single, Forward Current=1A, Height=2.1mm, Lead Free="Lead Free", Length=4.6mm, Manufacturer Part Number=RS1B-13-F, Max Reverse Voltage (DC)=100V, Mount="Surface Mount", Number of Pins=2, Output Current=1A, Packaging="Tape and Reel", Peak Non-Repetitive Surge Current=30A, Polarity=Standard, Pricing 1="1=0.43000, 10=0.28300, 100=0.14140, 500=0.10504, 1000=0.07676, 2000=0.07474 (USD)", Radiation Hardening=No, Recovery Time=150ns, Reverse Recovery Time=150ns, Reverse Voltage (DC)=100V, RoHS=Yes, Stock 1=119805, Supplier 1=Digi-Key, Voltage Rating (DC)=100V, Weight=0.002258oz, Width=2.92mm
D4: "DIODE SCHOTTKY 30V 1A SOD123W", Average Rectified Current=1A, Forward Voltage=360mV, MANUFACTURER="NXP Semiconductors", Max Operating Temperature=150°C, Max Power Dissipation=570mW, Max Repetitive Reverse Voltage (Vrrm)=30V, Max Reverse Leakage Current=1.5mA, Max Surge Current=50A, Min Operating Temperature=-55°C, Package Quantity=1, Supplier Part Number 1=1727-5201-6-ND, ComponentLink1Description=https://datasheet.ciiva.com/4715/pmeg3010er-117881-4715350.pdf, ComponentLink1URL=https://datasheet.ciiva.com/4715/pmeg3010er-117881-4715350.pdf, ComponentLink2Description=https://datasheet.ciiva.com/8299/pmeg3010er-8299296.pdf, ComponentLink2URL=https://datasheet.ciiva.com/8299/pmeg3010er-8299296.pdf, ComponentLink3Description=https://datasheet.ciiva.com/913/pmeg3010er-913784.pdf, ComponentLink3URL=https://datasheet.ciiva.com/913/pmeg3010er-913784.pdf, ComponentLink4Description=https://datasheet.ciiva.com/8294/pmeg3010er-8294409.pdf, ComponentLink4URL=https://datasheet.ciiva.com/8294/pmeg3010er-8294409.pdf, ComponentLink5Description=https://datasheet.ciiva.com/913/pmeg3010er-913782.pdf, ComponentLink5URL=https://datasheet.ciiva.com/913/pmeg3010er-913782.pdf, ComponentLink6Description=https://datasheet.ciiva.com/913/pmeg3010er-913783.pdf, ComponentLink6URL=https://datasheet.ciiva.com/913/pmeg3010er-913783.pdf, Element Configuration=Single, Forward Current=1A, Lead Free="Lead Free", Manufacturer Part Number=PMEG3010ER,115, Max Reverse Voltage (DC)=30V, Mount="Surface Mount", Number of Pins=2, Packaging="Tape and Reel", Peak Non-Repetitive Surge Current=50A, Peak Reverse Current=1.5mA, Pricing 1="1=0.38, 10=0.305, 100=0.2076, 500=0.1557, 1000=0.1168 (USD)", Radiation Hardening=No, Stock 1=2796, Supplier 1=Digi-Key
DF1: "DIODE SCHOTTKY 40V 3A SMB", Average Rectified Current=3A, Capacitance=180pF, Case/Package=SMB, Forward Voltage=450mV, MANUFACTURER=Diodes, Max Forward Surge Current (Ifsm)=70A, Max Operating Temperature=125°C, Max Repetitive Reverse Voltage (Vrrm)=40V, Max Reverse Current=2mA, Min Operating Temperature=-55°C, Package Quantity=3000, Supplier Part Number 1=B340LB-FDICT-ND, Category="Schottky Diodes", ComponentLink1Description=https://datasheet.ciiva.com/25946/ds30240-25946736.pdf?src-supplier=Avnet+Europe, ComponentLink1URL=https://datasheet.ciiva.com/25946/ds30240-25946736.pdf?src-supplier=Avnet+Europe, ComponentLink2Description=https://datasheet.ciiva.com/4715/ds30240-71143-4715794.pdf?src-supplier=Mouser, ComponentLink2URL=https://datasheet.ciiva.com/4715/ds30240-71143-4715794.pdf?src-supplier=Mouser, ComponentLink3Description=https://datasheet.ciiva.com/26949/getdatasheetpartid-146318-26949355.pdf?src-supplier=Verical, ComponentLink3URL=https://datasheet.ciiva.com/26949/getdatasheetpartid-146318-26949355.pdf?src-supplier=Verical, ComponentLink4Description=https://datasheet.ciiva.com/8303/ds30240-8303077.pdf?src-supplier=Avnet, ComponentLink4URL=https://datasheet.ciiva.com/8303/ds30240-8303077.pdf?src-supplier=Avnet, ComponentLink5Description=https://datasheet.ciiva.com/1177/ds30240-1177479.pdf?src-supplier=Element14, ComponentLink5URL=https://datasheet.ciiva.com/1177/ds30240-1177479.pdf?src-supplier=Element14, ComponentLink6Description=https://datasheet.ciiva.com/914/ds30240-914106.pdf?src-supplier=Digi-Key, ComponentLink6URL=https://datasheet.ciiva.com/914/ds30240-914106.pdf?src-supplier=Digi-Key, ComponentLink7Description=https://datasheet.ciiva.com/914/ds30240-914107.pdf?src-supplier=Digi-Key, ComponentLink7URL=https://datasheet.ciiva.com/914/ds30240-914107.pdf?src-supplier=Digi-Key, ComponentLink8Description=https://datasheet.ciiva.com/914/ds30240-914108.pdf?src-supplier=Digi-Key, ComponentLink8URL=https://datasheet.ciiva.com/914/ds30240-914108.pdf?src-supplier=Digi-Key, ComponentLink9Description=https://datasheet.ciiva.com/16380/ds30240-16380877.pdf?src-supplier=Future+Electronics, ComponentLink9URL=https://datasheet.ciiva.com/16380/ds30240-16380877.pdf?src-supplier=Future+Electronics, Current=3A, Current Rating=3A, Element Configuration=Single, Forward Current=3A, Height=2.5mm, Lead Free="Lead Free", Length=4.57mm, Manufacturer Part Number=B340LB-13-F, Max Reverse Voltage (DC)=40V, Mount="Surface Mount", Number of Pins=2, Output Current=3A, Packaging="Tape and Reel", Peak Non-Repetitive Surge Current=70A, Polarity=Standard, Pricing 1="1=0.40000, 10=0.31800, 100=0.22730, 500=0.17272, 1000=0.13635 (USD)", Radiation Hardening=No, REACH SVHC="No SVHC", RoHS=Yes, Stock 1=48742, Supplier 1=Digi-Key, Termination=SMD/SMT, Voltage=40V, Voltage Rating (DC)=40V, Weight=0.00328oz, Width=3.94mm
DF4: "RECT BRIDGE GPP 1A 400V DFS", Average Rectified Current=1A, Case/Package=SMD/SMT, Forward Voltage=1.1V, MANUFACTURER=Diodes, Max Forward Surge Current (Ifsm)=50A, Max Operating Temperature=150°C, Max Repetitive Reverse Voltage (Vrrm)=400V, Max Reverse Current=10uA, Min Operating Temperature=-65°C, Package Quantity=1, Reverse Voltage (DC)=280V, Supplier Part Number 1=60AC8755, Category="Rectifier Diodes", ComponentLink1Description=https://datasheet.ciiva.com/34302/1540050-34302383.pdf?src-supplier=Jameco, ComponentLink1URL=https://datasheet.ciiva.com/34302/1540050-34302383.pdf?src-supplier=Jameco, ComponentLink2Description=https://datasheet.ciiva.com/26788/df04s-t-26788074.pdf?src-supplier=IIIC, ComponentLink2URL=https://datasheet.ciiva.com/26788/df04s-t-26788074.pdf?src-supplier=IIIC, ComponentLink3Description=https://datasheet.ciiva.com/25958/ds17001-25958714.pdf?src-supplier=Avnet+Europe, ComponentLink3URL=https://datasheet.ciiva.com/25958/ds17001-25958714.pdf?src-supplier=Avnet+Europe, ComponentLink4Description=https://datasheet.ciiva.com/11195/ds17001-11195727.pdf?src-supplier=Avnet, ComponentLink4URL=https://datasheet.ciiva.com/11195/ds17001-11195727.pdf?src-supplier=Avnet, Element Configuration=Single, Forward Current=1A, Height=3.4mm, Lead Free="Lead Free", Length=8.51mm, Manufacturer Part Number=DF04S-T, Max Surge Current=50A, Mount="Surface Mount", Number of Elements=1, Number of Pins=4, Packaging="Tape and Reel", Peak Non-Repetitive Surge Current=50A, Radiation Hardening=No, RoHS=Yes, Supplier 1=Newark, Termination=SMD/SMT, Weight=0.010547oz, Width=6.5mm
IC2: "IC REG CTRLR FLYBK ISO SOT23-6", Case/Package=SOT-23-6, MANUFACTURER="Texas Instruments", Max Frequency=140kHz, Max Operating Temperature=125°C, Max Supply Voltage=35V, Min Operating Temperature=-20°C, Min Supply Voltage=9V, Nominal Supply Current=2.1mA, Operating Supply Current=2.65mA, Output Current=25mA, Output Voltage=14V, Package Quantity=3000, Supplier Part Number 1=296-39536-1-ND, Category="Voltage Regulators - Switching", ComponentLink1Description=http://components.arrow.com/part/dataview/0323_06089130?src-supplier=Arrow+Europe, ComponentLink1URL=http://components.arrow.com/part/dataview/0323_06089130?src-supplier=Arrow+Europe, ComponentLink2Description=http://components.arrow.com/part/dataview/51462043S196667N7713?src-supplier=Arrow+Electronics, ComponentLink2URL=http://components.arrow.com/part/dataview/51462043S196667N7713?src-supplier=Arrow+Electronics, ComponentLink3Description=http://www.ti.com/general/docs/lit/getliterature.tsp?genericPartNumber=UCC28702&&fileType=pdf&src-supplier=Avnet, ComponentLink3URL=http://www.ti.com/general/docs/lit/getliterature.tsp?genericPartNumber=UCC28702&&fileType=pdf&src-supplier=Avnet, ComponentLink4Description=http://www.ti.com/lit/ds/symlink/ucc28700.pdf?src-supplier=Digi-Key, ComponentLink4URL=http://www.ti.com/lit/ds/symlink/ucc28700.pdf?src-supplier=Digi-Key, ComponentLink5Description=http://www.ti.com/lit/gpn/ucc28700?src-supplier=Mouser, ComponentLink5URL=http://www.ti.com/lit/gpn/ucc28700?src-supplier=Mouser, Duty Cycle=99%, Fault Protection="Over Voltage", Isolation=Isolated, Lead Free="Lead Free", Manufacturer Part Number=UCC28700DBVR, Max Duty Cycle=99%, Mount="Surface Mount", Number of Outputs=1, Number of Pins=6, Packaging="Tape and Reel", Pricing 1="1=1.16000, 10=1.03300, 25=0.98000, 100=0.75250, 250=0.66500, 500=0.63000, 1000=0.49000 (USD)", RoHS=Yes, Stock 1=3760, Supplier 1=Digi-Key, Switching Frequency=140kHz, Topology=Flyback
J1: "CABLE ADAPTER 6 POS", MANUFACTURER=Tag-Connect, Package Quantity=1, Supplier Part Number 1=TC2030-IDC-ND, ComponentLink1Description=http://www.tag-connect.com/Materials/TC2030-MCP%20Datasheet.pdf?src-supplier=Digi-Key, ComponentLink1URL=http://www.tag-connect.com/Materials/TC2030-MCP%20Datasheet.pdf?src-supplier=Digi-Key, Manufacturer Part Number=TC2030-IDC, Pricing 1="1=43.71 (USD)", Stock 1=284, Supplier 1=Digi-Key
J5: "CONN HEADER VERT 2POS 2.5MM", Color=Natural, Contact Resistance=20mR, Current Rating=3A, Housing Color=White, MANUFACTURER=JST, Max Operating Temperature=85°C, Max Voltage Rating (AC)=250V, Min Operating Temperature=-25°C, Supplier Part Number 1=455-1611-ND, ComponentLink1Description=http://uk.rs-online.com/webdocs/05aa/0900766b805aab1f.pdf?src-supplier=RSComponents, ComponentLink1URL=http://uk.rs-online.com/webdocs/05aa/0900766b805aab1f.pdf?src-supplier=RSComponents, ComponentLink2Description=http://www.jst-mfg.com/product/pdf/eng/eEH.pdf?src-supplier=Digi-Key, ComponentLink2URL=http://www.jst-mfg.com/product/pdf/eng/eEH.pdf?src-supplier=Digi-Key, ComponentLink3Description=https://www.verical.com/server-webapp/html/getDatasheet?partID=639961&src-supplier=Verical, ComponentLink3URL=https://www.verical.com/server-webapp/html/getDatasheet?partID=639961&src-supplier=Verical, ComponentLink4Description=http://www1.futureelectronics.com/doc/JST/B2B-EH-A(LF)(SN).pdf?src-supplier=Future+Electronics, ComponentLink4URL=http://www1.futureelectronics.com/doc/JST/B2B-EH-A(LF)(SN).pdf?src-supplier=Future+Electronics, ComponentLink5Description=http://www.produktinfo.conrad.com/datenblaetter/1200000-1299999/001217319-da-01-en-STIFTLEISTE_GERADE_2_POL__RM_25MM.pdf?src-supplier=Conrad, ComponentLink5URL=http://www.produktinfo.conrad.com/datenblaetter/1200000-1299999/001217319-da-01-en-STIFTLEISTE_GERADE_2_POL__RM_25MM.pdf?src-supplier=Conrad, Connector Type="Male Pin,Plug", Contact Material="Copper Alloy,Brass", Contact Mating Length=0.13inch, Contact Plating=Tin,Copper, Depth=3.8mm, Fastening Type=Detent, Gender=Male, Housing Material=Nylon, Lead Free="Lead Free", Length=7.5mm, Manufacturer Part Number=B2B-EH-A(LF)(SN), Max Current Rating=3A, Mount="Through Hole", Number of Contacts=2, Number of Positions=2, Number of Rows=1, Orientation=Straight, Packaging=Bulk, Pitch=2.5mm, Pricing 1="1=0.14, 10=0.131, 100=0.0809, 500=0.06698, 1000=0.05861, 5000=0.05024, 10000=0.04884 (USD)", Stock 1=25023, Supplier 1=Digi-Key, Termination=Press-Fit, Voltage Rating=250V
J6 J7: "TERMINAL BLOCK 2POS 5.08MM SIDE", MANUFACTURER="TE Connectivity", Manufacturer P/N=1776493-2
L1: library part 84474C, "Ind Power Wirewound 470uH 10% 140mA 1812", Case/Package=Nonstandard, Current Rating=140mA, DC Resistance (DCR)=8.5R, MANUFACTURER=Murata, Max Operating Temperature=125°C, Min Operating Temperature=-40°C, Package Quantity=2000, Resistor Type=Wirewound, Supplier Part Number 1=811-3640-1-ND, Tolerance=10%, Category="Fixed Inductors", ComponentLink1Description=https://datasheet.ciiva.com/8506/kmp-8400-8506026.pdf?src-supplier=Avnet, ComponentLink1URL=https://datasheet.ciiva.com/8506/kmp-8400-8506026.pdf?src-supplier=Avnet, Depth=3.6mm, Height=2.6mm, Height - Seated (Max)=0.114inch, Inductance=470uH, Length=0.177inch, Manufacturer Part Number=84474C, Max DC Current=140mA, Mount="Surface Mount", Packaging="Tape and Reel", Pricing 1="1=0.53000, 5=0.51000, 10=0.49300, 25=0.44200, 50=0.37400, 100=0.32300, 250=0.23800, 500=0.22950, 1000=0.22610 (USD)", Radiation Hardening=No, RoHS=Yes, Shielding=Unshielded, Stock 1=1958, Supplier 1=Digi-Key, Termination=SMD/SMT, Width=3.3mm
LED2: "ADDRESS LED DISC SERIAL RGB 1=10", Color=Blue,Green,Red, MANUFACTURER="Adafruit Industries", Supplier Part Number 1=1528-1104-ND, ComponentLink1Description=https://cdn-shop.adafruit.com/product-files/1138/SK6812+LED+datasheet+.pdf?src-supplier=Digi-Key, ComponentLink1URL=https://cdn-shop.adafruit.com/product-files/1138/SK6812+LED+datasheet+.pdf?src-supplier=Digi-Key, ComponentLink2Description=http://www.mouser.com/ds/2/737/SK6812_LED_datasheet_-953546.pdf?src-supplier=Mouser, ComponentLink2URL=http://www.mouser.com/ds/2/737/SK6812_LED_datasheet_-953546.pdf?src-supplier=Mouser, Length=5mm, Manufacturer Part Number=1655, Mount="Surface Mount", Number of LEDs=10, Pricing 1="1=4.5 (USD)", Stock 1=2943, Supplier 1=Digi-Key, Width=5mm
P2 P4 P5 P6 P7 P8 P9 P18 P19 P20: "Test Point ON"
Q1: "MOSFET P-CHAN 24V SOT23", Case/Package=SOT-23, Continuous Drain Current (ID)=4.3A, Drain to Source Voltage (Vdss)=20V, Input Capacitance=634pF, MANUFACTURER=Diodes, Max Operating Temperature=150°C, Max Power Dissipation=800mW, Min Operating Temperature=-55°C, Supplier Part Number 1=DMP2045U-7DICT-ND, ComponentLink1Description=https://www.diodes.com/assets/Datasheets/DMP2045U.pdf?src-supplier=Digi-Key, ComponentLink1URL=https://www.diodes.com/assets/Datasheets/DMP2045U.pdf?src-supplier=Digi-Key, Manufacturer Part Number=DMP2045U-7, Mount="Surface Mount", Packaging="Tape and Reel", Pricing 1="1=0.45, 10=0.333, 100=0.1581, 500=0.12896, 1000=0.09568 (USD)", Rds On Max=45mR, Stock 1=22481, Supplier 1=Digi-Key
Q2 Q3: "TRANS NPN 40V 0.6A SMD SOT23-3", Case/Package=SOT-23, Collector Base Voltage (VCBO)=75V, Collector Emitter Breakdown Voltage=40V, Collector Emitter Saturation Voltage=1V, Continuous Collector Current=600mA, Current=1A, Emitter Base Voltage (VEBO)=6V, Frequency=300MHz, MANUFACTURER=Diodes, Max Operating Temperature=150°C, Max Power Dissipation=300mW, Min Operating Temperature=-55°C, Package Quantity=3000, Power Dissipation=350mW, Supplier Part Number 1=MMBT2222A-FDIDKR-ND, Collector Emitter Voltage (VCEO)=40V, ComponentLink1Description=http://www.diodes.com/datasheets/ds30041.pdf?src-supplier=Future+Electronics, ComponentLink1URL=http://www.diodes.com/datasheets/ds30041.pdf?src-supplier=Future+Electronics, ComponentLink2Description=http://www.diodes.com/datasheets/ds30041.pdf?src-supplier=Avnet, ComponentLink2URL=http://www.diodes.com/datasheets/ds30041.pdf?src-supplier=Avnet, ComponentLink3Description=https://www.verical.com/server-webapp/html/getDatasheet?partID=82692&src-supplier=Verical, ComponentLink3URL=https://www.verical.com/server-webapp/html/getDatasheet?partID=82692&src-supplier=Verical, ComponentLink4Description=https://www.diodes.com/assets/Datasheets/ds30041.pdf?src-supplier=Digi-Key, ComponentLink4URL=https://www.diodes.com/assets/Datasheets/ds30041.pdf?src-supplier=Digi-Key, ComponentLink5Description=http://www.diodes.com/datasheets/ds30041.pdf?src-supplier=Avnet+Europe, ComponentLink5URL=http://www.diodes.com/datasheets/ds30041.pdf?src-supplier=Avnet+Europe, ComponentLink6Description=http://www.diodes.com/datasheets/ds30041.pdf?src-supplier=Element14, ComponentLink6URL=http://www.diodes.com/datasheets/ds30041.pdf?src-supplier=Element14, Contact Plating=Matte,Tin, Current Rating=600mA, Element Configuration=Single, Gain Bandwidth Product=300MHz, Height=1mm, hFE Min=100, Lead Free="Lead Free", Length=3.05mm, Manufacturer Part Number=MMBT2222A-7-F, Max Breakdown Voltage=40V, Max Collector Current=600mA, Max Frequency=300MHz, Mount="Surface Mount", Number of Elements=1, Number of Pins=3, Packaging="Tape and Reel", Polarity=NPN, Pricing 1="1=0.15, 10=0.134, 100=0.0729, 500=0.04486, 1000=0.03059 (USD)", Radiation Hardening=No, REACH SVHC="No SVHC", Stock 1=2471182, Supplier 1=Digi-Key, Termination=SMD/SMT, Transition Frequency=300MHz, Voltage=40V, Voltage Rating (DC)=40V, Weight=0.000282oz, Width=1.4mm